# Altium PCB Membrane_Board_Latest.PcbDoc (part 2 of 4)
Units mil, origin at the board's own origin, x right, y up, seen from the top; angles counter-clockwise.
Board outline 11929.13 x 4962.8 mil, 2 copper layers (Top Layer, Bottom Layer), stack 59 mil thick; 247 components, 169 nets, 1256 pads, 657 vias.
Unrouted connection lines stored in the file: 293.
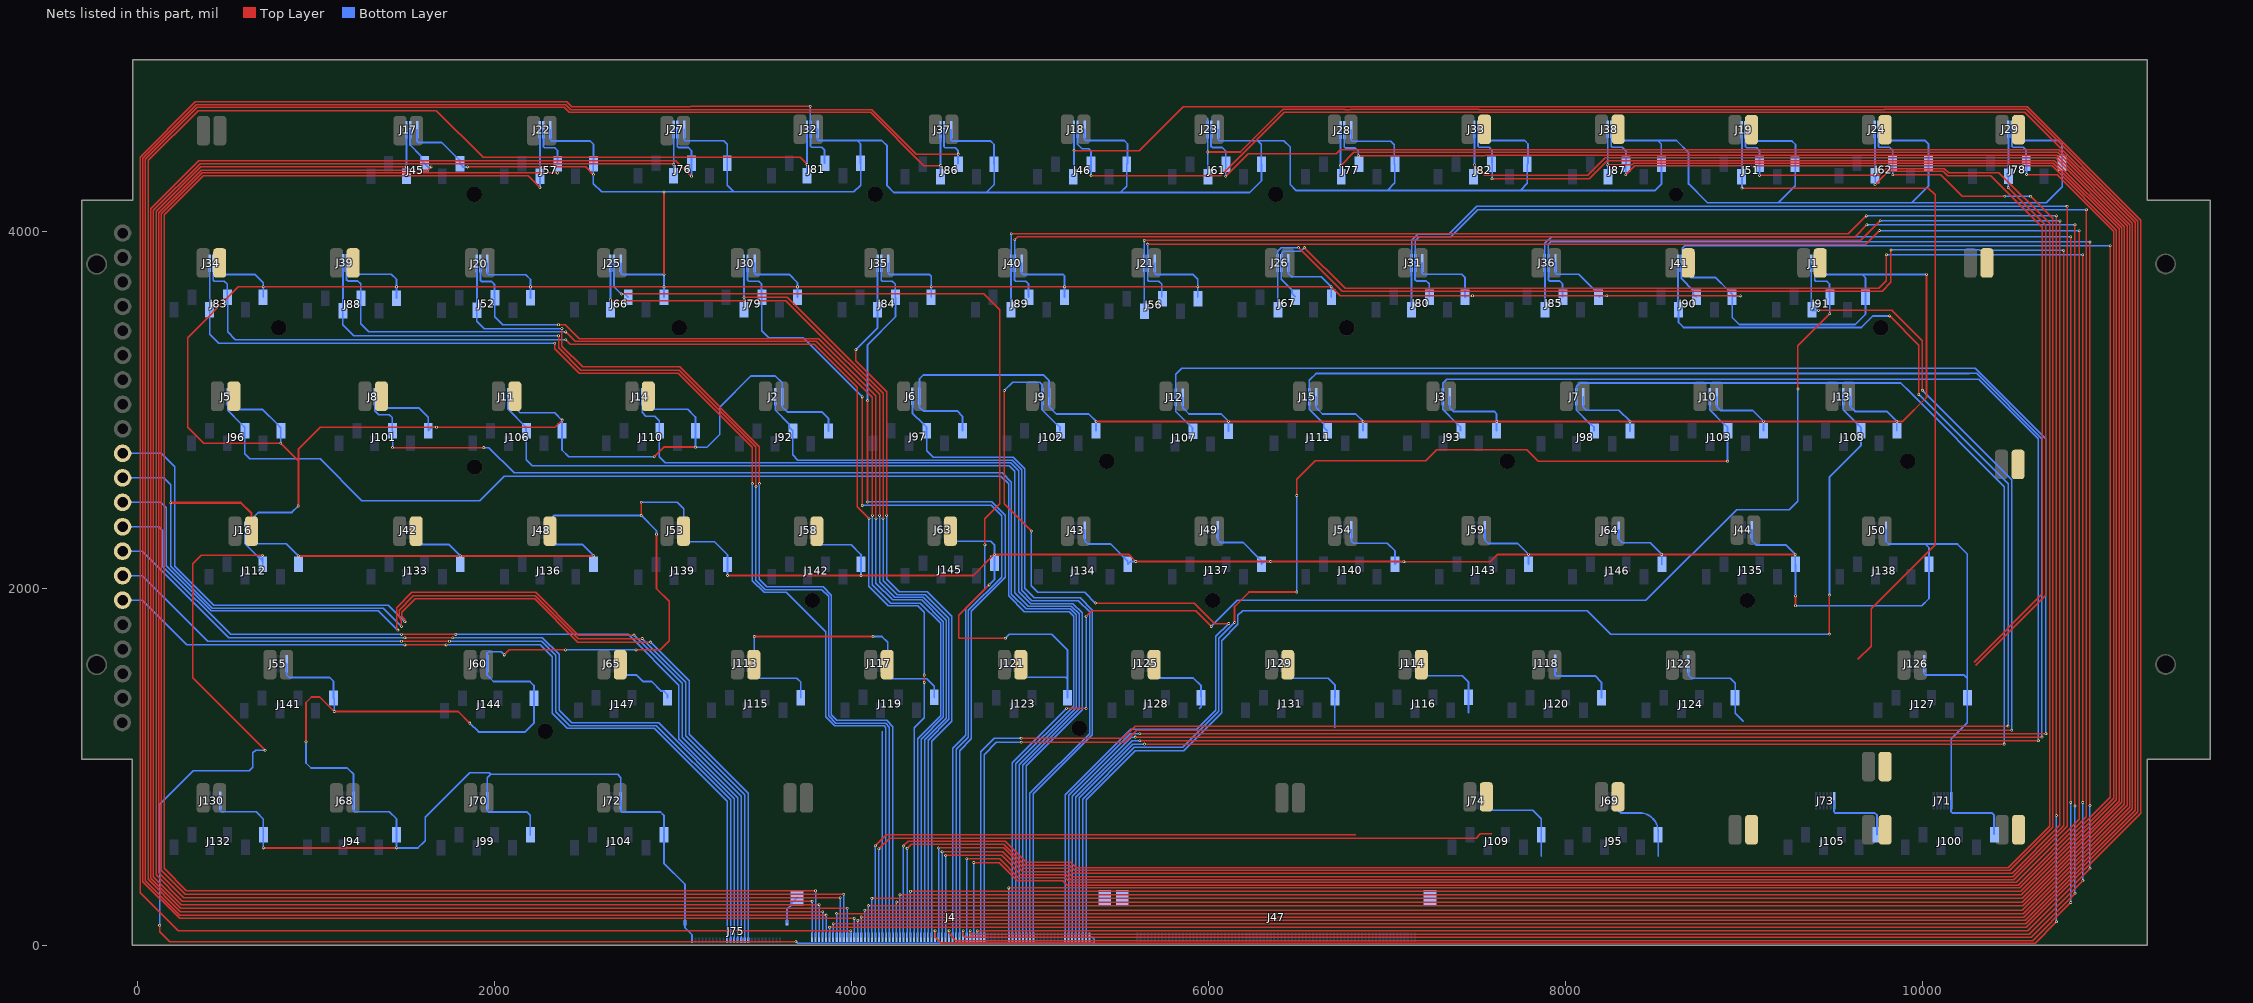
[diagram p2: the nets of this part, all layers, seen from the top]

## Via types
v1: diameter 15.75, hole 7.87, Top Layer to Bottom Layer, tented both sides, 655 vias
v2: diameter 23.62, hole 11.81, Top Layer to Bottom Layer, 2 vias

## Nets (pads, with @x,y where several pads share a name; then routed paths per layer and width w, separated by ;. In a path a pad name is that pad's centre, name@x,y a point inside that pad or via, vN(x,y) a via of type N, cw(c..) or ccw(c..) an arc to the next point about the centre after c; other vN are vias at no path point) (continued)
Col_2.COL_10: J75.10 P10.1 SW42.2 SW50.2 SW58.2 SW66.2 SW74.2 | length 5781.9
  Top Layer w8: v1(1497.31,1811.94) 1495.82,1813.43 1495.82,1827.73 1480.04,1843.51 1480.04,1866.71 1553.79,1940.46 2223.54,1940.46 2465.54,1698.46 v1(2873.74,1698.46)
  Bottom Layer w8: P10.1@-84.75,2756.11 131.14,2756.11 207,2680.25 207,2124.25 426.79,1904.46 1404.79,1904.46 v1(1497.31,1811.94) ; v1(2873.74,1698.46) 3090.84,1481.36 3090.84,1181.92 3420.84,851.92 J75.10@3420.84,28.46
Col_2.COL_11: J75.11 P11.1 SW43.2 SW51.2 SW59.2 SW67.2 SW75.2 | length 6270
  Top Layer w8: v1(1477.79,1786.46) 1477.79,1824.55 1465.04,1837.3 1465.04,1877.71 1544.79,1957.46 2228.33,1957.46 2467.33,1718.46 v1(2826.79,1718.46)
  Top Layer w12: v1(184.96,2479) 578,2479 637.52,2419.48 SW43.2@637.52,2320
  Bottom Layer w8: P11.1@-84.75,2618.96 145.31,2618.96 184.96,2579.31 184.96,2122.29 417.79,1889.46 1374.79,1889.46 v1(1477.79,1786.46) ; v1(2826.79,1718.46) 3071.16,1474.09 3071.16,1173.77 3401.16,843.77 J75.11@3401.16,28.46
Col_2.COL_12: J75.12 P12.1 SW44.2 SW52.2 SW60.2 SW68.2 SW76.2 | length 5580.5
  Top Layer w8: v1(1457.79,1765.46) 1457.79,1766.27 1450.04,1774.02 1450.04,1889.71 1536.79,1976.46 2230.54,1976.46 2469.54,1737.46 v1(2780.79,1737.46)
  Bottom Layer w8: P12.1@-84.75,2481.81 128.19,2481.81 158.79,2451.21 158.79,2126.46 410.79,1874.46 1348.79,1874.46 v1(1457.79,1765.46) ; v1(2780.79,1737.46) 3051.47,1466.77 3051.47,1165.61 3381.47,835.61 J75.12@3381.47,28.46
Col_2.COL_13: J75.13 P13.1 SW45.2 SW53.2 SW61.2 SW69.2 SW77.2 | length 5162.1
  Top Layer w8: v1(1477.79,1741.46) v1(1781.96,1741.46)
  Bottom Layer w8: P13.1@-84.75,2344.66 119.15,2344.66 141.59,2322.22 141.59,2120.66 520.79,1741.46 v1(1477.79,1741.46) ; v1@1787.96,1741.46 2748.23,1741.46 3031.79,1457.9 3031.79,1157.46 3361.79,827.46 J75.13@3361.79,28.46
Col_2.COL_14: J75.14 P14.1 SW46.2 SW54.2 SW62.2 SW70.2 SW78.2 | length 4993.4
  Top Layer w8: v1(1497.31,1722.4) v1(1764.79,1722.4)
  Bottom Layer w8: P14.1@-84.75,2207.51 25.25,2207.51 510.3,1722.46 542.79,1722.46 ; 526.54,1722.4 v1(1497.31,1722.4) ; v1(1764.79,1722.4) 2267.6,1722.4 2360.84,1629.16 2360.84,1316.92 2426.51,1251.25 2432.01,1245.76 2918.36,1245.76 3342.1,822.02 J75.14@3342.1,28.46
Col_2.COL_15: J75.15 P15.1 SW47.2 SW55.2 SW63.2 SW71.2 SW79.2 | length 4898.3
  Top Layer w8: v1(1477.79,1702.71) v1(1746.79,1702.71)
  Bottom Layer w8: P15.1@-84.75,2070.36 25.25,2070.36 393.15,1702.46 v1@1477.79,1702.46 ; v1(1746.79,1702.71) 2263.29,1702.71 2341.16,1624.84 2341.16,1308.77 2419.47,1230.46 2905.82,1230.46 3322.42,813.86 J75.15@3322.42,28.46
Col_2.COL_16: J75.16 P16.1 SW48.2 SW56.2 SW64.2 SW80.2 | length 4861.8
  Top Layer w8: v1(1497.31,1683.03) v1(1727.79,1683.03)
  Bottom Layer w8: P16.1@-84.75,1933.21 25.25,1933.21 275.43,1683.03 ; 319.79,1683.03 275.43,1683.03 ; v1(1497.31,1683.03) 275.43,1683.03 ; v1(1727.79,1683.03) 2255.97,1683.03 2321.47,1617.53 2321.47,1300.61 2406.63,1215.46 2892.98,1215.46 3302.73,805.71 J75.16@3302.73,28.46
GND: J1.6 J2.6 J3.6 J4.MP1 J4.MP2 J5.6 J6.6 J7.6 J8.6 J9.6 J10.6 J11.6 J12.6 J13.6 J14.6 J15.6 J16.6 J17.6 J18.6 J19.6 J20.6 J21.6 J22.6 J23.6 J24.6 J25.6 J26.6 J27.6 J28.6 J29.6 J30.6 J31.6 J32.6 J33.6 J34.6 J35.6 J36.6 J37.6 J38.6 J39.6 J40.6 J41.6 J42.6 J43.6 J44.6 J45.6 J46.6 J47.MP1 J47.MP2 J48.6 J49.6 J50.6 J51.6 J52.6 J53.6 J54.6 J55.6 J56.6 J57.6 J58.6 J59.6 J60.6 J61.6 J62.6 J63.6 J64.6 J65.6 J66.6 J67.6 J68.6 J69.6 J70.6 J71.6 J72.6 J73.6 J74.6 J75.26 J75.MP1 J75.MP2 J76.6 J77.6 J78.6 J79.6 J80.6 J81.6 J82.6 J83.6 J84.6 J85.6 J86.6 J87.6 J88.6 J89.6 J90.6 J91.6 J92.6 J93.6 J94.6 J95.6 J96.6 J97.6 J98.6 J99.6 J100.6 J101.6 J102.6 J103.6 J104.6 J105.6 J106.6 J107.6 J108.6 J109.6 J110.6 J111.6 J112.6 J113.6 J114.6 J115.6 J116.6 J117.6 J118.6 J119.6 J120.6 J121.6 J122.6 J123.6 J124.6 J125.6 J126.6 J127.6 J128.6 J129.6 J130.6 J131.6 J132.6 J133.6 J134.6 J135.6 J136.6 J137.6 J138.6 J139.6 J140.6 J141.6 J142.6 J143.6 J144.6 J145.6 J146.6 J147.6 | length 86289.4
  Top Layer w8: v1@1449.78,3689.56 v1(1449.96,3689.56) v1@2200.23,3689.56 ; v1(1847,4361.13) 2510.79,4361.13 v1(2553.79,4318.13) ; v1(2201,3689.56) v1(2949,3689.56) v1(3696.79,3689.56) v1(4445.79,3689.56) v1(5193.47,3689.56) v1(5939.79,3689.56) ; 4601.13,1720.46 4601.13,1849.7 v1(4770.34,2018.91) ; v1@5940.53,3689.56 v1(6687.3,3689.56) 6737.87,3639 v1(7479,3639) v1(8231,3639) 8231.5,3638.5 8979.5,3638.5 v1(8980,3638)
  Top Layer w10: v1@704.1,3689.56 v1@1449.78,3689.56 ; v1@704.27,545.27 v1(1450.69,545.27) ; v1@705.1,3689 564.33,3689 280,3404.67 280,2902 369.54,2812.46 v1(801.73,2812.46) 900.42,2713.77 ; v1(900.42,2181.46) v1(1807.79,2181.46) v1(2554.79,2181.46) ; v1@900.42,2461 900.42,2713.77 ; v1(943.07,1140.46) 943.07,1360.07 974,1391 1019.25,1391 v1(1100.79,1309.46) 1795.79,1309.46 v1(1860.79,1244.46) ; v1(2054,1627) 2082,1655 v1(2397,1655) ; v1(2378.79,2942.46) 2338.33,2902 v1(1674,2902) 1023.65,2902 900.42,2778.77 900.42,2713.77 ; v1(2792,1655) 2928,1655 2978,1705 2978,1927.25 2906.92,1998.33 v1(2906.92,2302.46) ; v1(2821,2407) v1(2821,2482) ; v1(2894,2737) 2948,2791 v1@3125,2791 ; v1(2949,3759) v1(2948.96,4220.46) ; v1(3304.79,2071.81) v1(4052.79,2071.81) 4682.1,2071.81 v1(4800.1,2189.81) 5552.19,2189.81 v1(5592,2150) v1(6347.79,2150) v1@7093.18,2150 ; v1(3454.16,1729.46) v1(4119.79,1729.46) ; 4601.13,1720.46 v1(4861.79,1720.46) ; v1(5369.79,2935) v1(6111.79,2935) v1(6866.1,2935) v1(7614.79,2935) v1(8361.79,2935) v1@9109.33,2935 ; v1(7094.73,2148.13) 7578.13,2148.13 7619.81,2189.81 v1(7792.79,2189.81) v1(8539.79,2189.81) v1(9287.79,2189.81) ; v1(9109.79,2935) v1(9856.79,2935) 9889,2935 10022.79,3068.79 v1(10022.79,3758.46) ; v1(9288.79,1902.46) v1(9288.79,1957.46)
  Bottom Layer w8: 1592.29,566.96 1610.79,585.46 1610.79,717.46 1859.08,965.75 1969.5,965.75 1977.79,957.46 ; J70.6@1958.84,809.75 1958.84,938.51 1977.79,957.46 ; J57.6@2553.73,4378.25 2553.73,4266.27 2599.54,4220.46 v1(2948.96,4220.46) 3340.79,4220.46 ; J72.6@2707.47,809.75 2707.47,939.47 2689.48,957.46 1977.79,957.46 ; J76.6@3303.16,4382.32 3303.16,4258.09 3340.79,4220.46 ; J81.6@4050.16,4380.25 4050.16,4301.24 4050.48,4300.92 4050.48,4259.14 4011.79,4220.46 3340.79,4220.46 ; 5947.79,1325.46 5958.1,1335.77 J128.6@5958.1,1387.25 J128.6@5958.1,1393.46 ; J85.6@8185.1,3631.25 8192.86,3639 v1(8231,3639)
  Bottom Layer w10: J34.6@462.16,3821.75 462.16,3764.61 468.02,3758.75 655.81,3758.75 703.1,3711.46 v1(703.1,3689.56) J83.6@703.1,3630.25 ; J130.6@462.84,810.75 462.84,753.61 468.7,747.75 663.5,747.75 703.79,707.46 J132.6@703.79,619.25 703.96,619.07 v1(703.96,545) ; J5.6@543.79,3073.75 544.61,3072.93 544.61,3017.25 560.86,3001 701,3001 781.45,2920.55 781.73,2920.55 801.73,2900.55 J96.6@801.73,2882.25 v1(801.73,2812.46) ; J55.6@835.16,1576.75 835.16,1513.88 849.04,1500 1076,1500 1097.1,1478.9 J141.6@1097.1,1385.25 1100.79,1381.56 v1(1100.79,1309.46) ; v1(900,2461) 864,2425 677,2425 640.47,2388.47 J16.6@640.47,2325.75 640.47,2265.53 657,2249 832.88,2249 v1(900.42,2181.46) ; v1(943.07,1140.46) 943.07,1020.93 971,993 1174,993 1209.79,957.21 J68.6@1209.79,810.75 1209.79,753.61 1215.65,747.75 1410.44,747.75 1450.73,707.46 J94.6@1450.73,619.25 v1(1450.69,545.27) 1570.6,545.27 1592.29,566.96 ; J39.6@1209.79,3822.75 1209.79,3765.61 1215.65,3759.75 1421.67,3759.75 1449.96,3731.46 v1(1449.96,3689.56) 1449.96,3626.44 J88.6@1450.79,3625.62 ; J8.6@1366.84,3073.75 1366.84,3016.61 1372.7,3010.75 1575.25,3010.75 1627.79,2958.21 J101.6@1627.79,2882.25 1647.54,2902 v1(1674,2902) ; J42.6@1564.16,2325.75 1564.68,2325.23 1564.68,2251.86 1570.54,2246 1742.56,2246 v1@1807.1,2181.46 ; J17.6@1565.21,4569.75 1565.21,4503.86 1571.07,4498 1704,4498 1785.45,4416.55 1786.16,4416.55 1806.16,4396.55 J45.6@1806.16,4378.25 1823.28,4361.13 v1(1847,4361.13) ; v1(1860.79,1244.46) 1909.79,1195.46 2170.79,1195.46 2219.79,1244.46 J144.6@2219.79,1384.62 2219.79,1455 2197.33,1477.46 1993.34,1477.46 1957.84,1512.95 J60.6@1957.84,1576.75 ; J60.6@1957.67,1576.92 1957.67,1636.96 1965.29,1644.58 2036.42,1644.58 v1(2054,1627) ; J70.6@1958.84,809.75 1958.84,752.61 1964.7,746.75 2180.42,746.75 2199.79,727.38 J99.6@2199.79,618.25 ; J20.6@1959.47,3819.75 1959.65,3819.58 1959.65,3762.61 1965.51,3756.75 2174.5,3756.75 2201,3730.25 v1(2201,3689.56) J52.6@2201,3626.33 ; J11.6@2114.47,3073.75 2114.47,3011.58 2142.06,2984 2335.88,2984 2377.42,2942.46 J106.6@2377.42,2882.25 2377.42,2774.58 2415,2737 v1(2894,2737) ; J22.6@2312.79,4569.75 2312.79,4512.61 2318.65,4506.75 2534.36,4506.75 2553.73,4487.38 2553.73,4423.02 ; v1(2397,1655) 2723,1655 ; J57.6@2553.73,4378.25 2553.79,4378.3 J57.6@2553.79,4421.13 ; v1@2554.42,2181.46 2489.88,2246 2335,2246 2313.47,2267.53 J48.6@2313.47,2325.75 2313.47,2388.14 2333.79,2408.46 2821,2408.46 2906.92,2322.54 v1(2906.92,2302.46) ; J72.6@2707.47,809.75 2707.47,752.61 2713.33,746.75 2917.79,746.75 2918.08,746.46 2929.34,746.46 2948.42,727.38 J104.6@2948.42,618.25 2948.42,459.58 3066.51,341.49 J75.MP1@3066.51,126.88 3066.51,98.49 3105.88,59.12 J75.26@3105.88,28.46 ; J25.6@2707.47,3821.75 2707.65,3821.58 2707.65,3764.61 2713.51,3758.75 2949,3758.75 v1(2949,3689.56) 2949,3630.83 J66.6@2948.42,3630.25 ; v1(2792,1655) 2723,1655 ; v1(2821,2482) 3023,2482 3059.84,2445.16 J53.6@3059.84,2324.75 3061.73,2322.86 3061.73,2275.95 3076.69,2261 3231.6,2261 3304.79,2187.81 J139.6@3304.79,2133.25 v1(3304.79,2071.81) ; J14.6@2865.16,3073.75 2866.12,3072.79 2866.12,3017.39 2880.51,3003 3082,3003 3125.1,2959.9 J110.6@3125.1,2882.25 3125.1,2790.63 3190,2790.63 3260.79,2861.42 3260.79,3015.46 3434.79,3189.46 3572.54,3189.46 3611.16,3150.84 J2.6@3611.16,3072.75 ; J147.6@2968.73,1386.25 2968.73,1404 2948.73,1424 2933,1424 2879,1478 2830,1478 2793.25,1514.75 2711.82,1514.75 2705.96,1520.61 2705.96,1577.58 2705.79,1577.75 2705.79,1637.79 2723,1655 ; J27.6@3062.21,4570.75 3062.21,4513.61 3068.07,4507.75 3283.79,4507.75 3303.16,4488.38 J76.6@3303.16,4382.32 ; v1(3454.16,1729.46) J113.6@3454.16,1578.75 3454.16,1518.16 3475.94,1496.38 3693.62,1496.38 3715.1,1474.9 J115.6@3715.1,1387.25 ; J30.6@3456.16,3821.75 3456.33,3821.58 3456.33,3764.61 3462.19,3758.75 3650.35,3758.75 3697.1,3712 J79.6@3697.1,3630.25 ; J2.6@3611.56,3072.35 3611.56,3015.84 3639.4,2988 3832,2988 3871.1,2948.9 J92.6@3871.1,2881.25 ; J75.MP2@3637.38,126.88 3637.38,201.38 3663.71,227.71 3663.71,236.47 J4.MP1@3694.14,266.9 ; J58.6@3807.84,2325.75 3807.84,2260.16 3824.62,2243.38 3998.22,2243.38 4052.79,2188.81 J142.6@4052.79,2134.25 v1(4052.79,2071.81) ; J32.6@3809.21,4571.75 3809.39,4571.58 3809.39,4514.61 3815.25,4508.75 4030.79,4508.75 ; J81.6@4050.16,4380.25 4050.16,4489.38 4030.79,4508.75 ; v1(4119.79,1729.46) 4170.54,1729.46 4202.16,1697.84 J117.6@4202.16,1579.75 ; J117.6@4202,1575 4202.16,1574.84 4202.16,1514.92 4223.62,1493.46 4420.1,1493.46 4463.1,1450.46 J119.6@4463.1,1388.25 ; J35.6@4205.16,3821.75 4205.33,3821.58 4205.33,3764.61 4211.19,3758.75 4435.5,3758.75 4446.1,3748.14 J84.6@4446.1,3630.25 ; J37.6@4557.21,4568.75 4557.21,4511.61 4563.07,4505.75 4778.79,4505.75 4798.16,4486.38 J86.6@4798.16,4377.25 ; J63.6@4559.16,2326.75 4559.16,2269.61 4565.02,2263.75 4780.73,2263.75 4800.1,2244.38 v1(4800.1,2189.81) 4800.1,2048.68 v1(4770.34,2018.91) ; J97.6@4621.1,2883.25 4621.1,2963.9 4591,2994 4401,2994 4380.16,3014.84 J6.6@4380.16,3074.75 4380.16,3172.83 4402.79,3195.46 5073.54,3195.46 5106.84,3162.16 J9.6@5106.84,3073.75 5107.05,3073.55 5107.05,3016.64 5147.23,2976.46 5328.33,2976.46 v1(5369.79,2935) J102.6@5369.79,2882.25 ; J86.6@4798.79,4376.62 4798.79,4262.46 4753.79,4217.46 ; v1(4861.79,1720.46) 4883.79,1742.46 5120.79,1742.46 5210.42,1652.83 J123.6@5210.42,1387.25 ; J121.6@4950.47,1578.75 J121.6@4950.47,1578.75 4950.52,1522.52 4972.04,1501 5200,1501 5209,1492 ; J40.6@4952.53,3821.75 4952.7,3821.58 4952.7,3764.61 4958.56,3758.75 5184.5,3758.75 5193.47,3749.77 v1(5193.47,3689.56) J89.6@5193.47,3630.25 ; J18.6@5305.16,4571.75 5305.16,4514.61 5311.02,4508.75 5526.73,4508.75 5546.1,4489.38 J46.6@5546.1,4380.25 ; J43.6@5306.47,2325.75 5306.47,2265.53 5324,2248 5451.97,2248 5547.42,2152.55 J134.6@5547.42,2134.25 5563.17,2150 v1(5592,2150) ; J46.6@5541.79,4376.62 5541.79,4253.46 5505.79,4217.46 ; J125.6@5697.16,1578.75 5697.16,1516.84 5716.88,1497.12 5914.88,1497.12 5958.1,1453.9 J128.6@5958.1,1393.46 ; J21.6@5698.47,3821.75 5698.65,3821.58 5698.65,3764.61 5704.51,3758.75 5912.13,3758.75 5939.42,3731.46 J56.6@5939.42,3630.25 ; J12.6@5856.02,3068.92 5856.02,3010.98 5890.54,2976.46 6070.33,2976.46 v1(6111.79,2935) J107.6@6111.79,2879.25 ; J49.6@6052.84,2326.75 6052.84,2268.84 6064.69,2257 6193,2257 6276.45,2173.55 6276.79,2173.55 6296.79,2153.55 J137.6@6296.79,2135.25 6311.54,2150 v1(6347.79,2150) ; J23.6@6053.84,4570.75 6053.84,4513.61 6059.7,4507.75 6275.42,4507.75 ; J129.6@6445,1587.92 6445.58,1587.92 6446.68,1586.83 6446.68,1580.56 6447.38,1579.86 6447.38,1521.34 6472.33,1496.38 6670.62,1496.38 6708,1459 6708,1387.83 J131.6@6707.42,1387.25 6707.42,1219.46 ; J26.6@6447.16,3822.75 6447.16,3763.84 6466,3745 6632.67,3745 6688.1,3689.56 J67.6@6688.1,3631.25 ; J15.6@6603.16,3073.75 6603.16,3011.92 6638.62,2976.46 6824.65,2976.46 v1(6866.1,2935) J111.6@6866.1,2882.25 ; J28.6@6799.21,4567.75 6799.21,4510.61 6805.07,4504.75 7020.79,4504.75 7040.16,4485.38 J77.6@7040.16,4376.25 ; J54.6@6800.79,2326.75 6800.79,2264.21 6813,2252 7002,2252 7044.73,2209.27 J140.6@7044.73,2135.25 7059.49,2150 7061.36,2148.13 v1(7094.73,2148.13) ; J77.6@7043.79,4376.62 7043.79,4271.46 7000.79,4228.46 ; J114.6@7194.16,1579.75 7194.16,1520.88 7205.04,1510 7421,1510 7457,1474 ; J31.6@7196.84,3822.75 7196.84,3765.61 7202.7,3759.75 7418.42,3759.75 7437.79,3740.38 J80.6@7437.79,3631.25 7445.54,3639 v1(7479,3639) ; J3.6@7351.21,3073.75 7351.21,3010.87 7371.08,2991 7600.25,2991 7614.79,2976.46 ; 7457.1,1302.77 J116.6@7457.1,1388.25 7457.1,1474 ; J59.6@7548.79,2326.75 7548.95,2326.59 7548.95,2269.59 7567.54,2251 7731.55,2251 7792.73,2189.81 J143.6@7792.73,2135.25 ; J33.6@7549.21,4571.75 7549.21,4514.61 7555.07,4508.75 7770.79,4508.75 7790.16,4489.38 J82.6@7790.16,4380.25 ; 7569.79,756.46 7815.79,756.46 7864.47,707.77 J109.6@7864.47,619.25 7863.79,618.56 7863.79,498.46 ; J93.6@7614.16,2882.25 7614.16,2976.46 ; J82.6@7785.79,4376.62 7785.79,4268.46 7745.79,4228.46 ; J118.6@7941.7,1576.45 7941.7,1514.86 7947.56,1509 8166,1509 8201.47,1473.53 J120.6@8201.47,1387.25 ; J36.6@7944.16,3822.75 7944.16,3765.61 7950.02,3759.75 8074.25,3759.75 8164.45,3669.55 J85.6@8200.45,3669.55 ; J7.6@8099.21,3072.75 8099.21,3014.68 8115.89,2998 8299.16,2998 8362.16,2935 J98.6@8362.16,2881.25 ; J38.6@8295.47,4571.75 8295.47,4514.61 8301.33,4508.75 8517.05,4508.75 ; J64.6@8297.47,2325.75 8299.36,2323.86 8299.36,2274.58 8318.95,2255 8474.6,2255 v1(8539.79,2189.81) 8539.79,2134.88 J146.6@8540.42,2134.25 ; J69.6@8299.47,809.75 8299.47,751.36 8309.38,741.46 8414.54,741.46 cw(c8414.54,636.21) 8519.79,636.21 8519.79,619.62 J95.6@8519.42,619.25 8519.42,498.83 ; J87.6@8536.42,4380.25 8536.42,4489.38 8517.05,4508.75 ; J87.6@8538.79,4376.62 8538.79,4267.46 8499.79,4228.46 7745.79,4228.46 ; J122.6@8688.84,1577.75 8688.84,1514.24 8707.08,1496 8923,1496 8950.79,1468.21 J124.6@8950.79,1386.25 8950.79,1300.46 8995.79,1255.46 ; J41.6@8690.16,3821.75 8690.16,3755.84 8704,3742 8840,3742 8913.45,3668.55 8914.1,3668.55 8934.1,3648.55 J90.6@8934.1,3630.25 ; J10.6@8847.53,3073.75 8848.02,3073.26 8848.02,3017.02 8869.04,2996 9048.47,2996 9109.47,2935 J103.6@9109.47,2882.25 ; v1@8979.24,3638 8941.86,3638 J90.6@8934.1,3630.25 ; J44.6@9044.79,2326.75 9044.96,2326.58 9044.96,2266.04 9068,2243 9234.6,2243 v1(9287.79,2189.81) 9287.79,2136.19 J135.6@9288.73,2135.25 v1@9288.73,1957.46 ; J19.6@9047.84,4568.75 9047.84,4511.61 9053.7,4505.75 9269.42,4505.75 9288.79,4486.38 J51.6@9288.79,4377.25 ; J51.6@9286.79,4376.62 9287.79,4375.62 9287.79,4255.79 9192,4160 ; v1(9288.79,1902.46) 9996.79,1902.46 10036.79,1942.46 J138.6@10036.79,2134.25 10036.79,2227.21 10016,2248 ; J1.6@9440.16,3821.75 9440.16,3764.61 9446.02,3758.75 9661.73,3758.75 ; J73.6@9504.84,809.75 9504.84,747.32 9510.7,741.46 9731.71,741.46 9745.79,727.38 J105.6@9745.79,619.25 ; J13.6@9595.84,3073.75 9595.33,3073.24 9595.83,3072.74 9595.33,3072.24 9596.33,3071.24 9596.33,3017.33 9622.67,2991 9800.79,2991 v1(9856.79,2935) J108.6@9856.79,2882.25 ; J24.6@9792.53,4572.75 9792.53,4515.61 9798.39,4509.75 10014.1,4509.75 10033.47,4490.38 J62.6@10033.47,4381.25 10033.47,4253.47 9940,4160 ; J50.6@9795.84,2325.75 9795.84,2262.16 9810,2248 10016,2248 ; J126.6@10010.79,1577.75 10010.79,1520.61 10016.65,1514.75 10232.36,1514.75 10251.73,1495.38 ; v1@10022.79,3758.75 9661.73,3758.75 ; J71.6@10160.84,810.12 10160.84,747.32 10166.7,741.46 10388.08,741.46 10401.79,727.75 J100.6@10401.79,621.69 ; J71.6@10161.21,809.75 10161.21,1155.88 10251.73,1246.4 J127.6@10251.73,1386.25 10251.73,1495.38 ; J29.6@10540.84,4571.75 10540.84,4514.61 10546.7,4508.75 10762.42,4508.75 10781.79,4489.38 J78.6@10781.79,4380.25 10783.79,4378.25 10783.79,4249.79 10694,4160 9940,4160 ; 4030.79,4508.75 4168.5,4508.75 4198.79,4478.46 4198.79,4255.46 4236.79,4217.46 4753.79,4217.46 ; 4753.79,4217.46 5505.79,4217.46 ; 5505.79,4217.46 6230.79,4217.46 6296.79,4283.46 J61.6@6296.79,4376.62 6296.79,4377.25 6294.79,4379.25 6294.79,4488.38 6275.42,4507.75 ; 6275.42,4507.75 6422.5,4507.75 6457.79,4472.46 6457.79,4262.46 6491.79,4228.46 7000.79,4228.46 ; 7000.79,4228.46 7745.79,4228.46 ; 8517.05,4508.75 8622.25,4508.75 8690,4441 8690,4266 8796,4160 9192,4160 ; J90.6@8934.1,3630.25 8934.1,3517 8973.1,3478 9624,3478 9681.1,3535.1 J91.6@9681.1,3630.25 9681.1,3739.38 9661.73,3758.75 ; 9192,4160 9940,4160 ; 10016,2248 10196,2248 10251.73,2192.27 10251.73,1495.38
  other v1: 3125,2790.63
I2C1.SCL_1: J4.9 J17.4 J45.4 | length 9696.6
  Top Layer w8: v1(1644,4361.13) 1625.13,4342.25 354.83,4342.25 118,4105.43 118,406 258,266 v1(3936,266)
  Bottom Layer w8: J4.9@3936,44.73 v1(3936,266)
  Bottom Layer w10: J17.4@1525.84,4569.75 1525.84,4484.16 1586.16,4423.84 1586.16,4401.13 1626.16,4361.13 v1(1644,4361.13)
I2C1.SCL_2: J4.10 J22.4 J57.4 | length 10369.2
  Top Layer w8: v1(2352.1,4327.25) 361.04,4327.25 133,4099.21 133,419 266,286 v1(3956,286)
  Bottom Layer w8: J4.10@3955.95,44.46 v1(3956,286)
  Bottom Layer w10: J22.4@2273.42,4569.75 2273.42,4474.61 2279.28,4468.75 2336.1,4468.75 2352.1,4452.75 J57.4@2352.1,4379.88
I2C1.SCL_3: J4.11 J27.4 J76.4 | length 11390.4
  Top Layer w8: v1@3101.53,4308.54 3015.07,4395 342,4395 73,4126 73,374.85 240.85,207 v1(3976,207)
  Bottom Layer w8: J4.11@3976,44.82 v1(3976,207)
  Bottom Layer w10: J27.4@3022.84,4570.75 3022.84,4475.61 3028.7,4469.75 3085.53,4469.75 3103.16,4452.12 J76.4@3103.16,4382.32 v1(3103.16,4308.54)
I2C1.SCL_4: J4.12 J32.4 J81.4 | length 12510.7
  Top Layer w8: v1(3768.79,4700.87) 3101,4700.87 3097.12,4697 2431.43,4697 2403.43,4725 322.36,4725 13,4415.64 13,294 226,81 v1(3995,81)
  Bottom Layer w8: v1(3768.79,4700.87) 3768.79,4638.46 3769.32,4637.93 3769.32,4572.28 J32.4@3769.84,4571.75 ; J4.12@3995,44.78 3995.16,44.95 3995.16,80.84 v1(3995,81)
  Bottom Layer w10: J32.4@3769.84,4571.75 3769.84,4476.61 3775.7,4470.75 3832.53,4470.75 3848.53,4454.75 J81.4@3848.53,4381.88
I2C1.SCL_5: J4.13 J37.4 J86.4 | length 13296.2
  Top Layer w8: v1@4015.76,150 234.21,150 28,356.21 28,4409.43 328.57,4710 2397.21,4710 2425.21,4682 4113,4682 4362.17,4432.83 v1(4597.16,4432.83)
  Bottom Layer w8: J4.13@4015.01,44.46 v1(4015,150)
  Bottom Layer w10: J37.4@4517.84,4568.75 4517.84,4473.61 4523.7,4467.75 4580.53,4467.75 4596.53,4451.75 J86.4@4596.53,4378.88
I2C1.SCL_6: J4.14 J18.4 J46.4 | length 17365.7
  Top Layer w8: v1(4035,139) 10575,139 11192,756 11192,4050.71 10574.71,4668 9793.78,4668 9793.03,4667.25 7509.55,4667.25 7508.8,4668 6800.04,4668 6799.29,4667.25 6758.8,4667.25 6758.06,4668 6425,4668 6069.46,4312.46 v1@5344.47,4312.46
  Bottom Layer w8: J4.14@4035,44.76 v1(4035,139)
  Bottom Layer w10: J18.4@5265.79,4571.75 5265.79,4488.21 5291,4463 5328,4463 5341.79,4449.21 J46.4@5341.79,4376.62 v1(5341.79,4312.46)
I2C1.SCL_7: J4.15 J23.4 J61.4 | length 16414.1
  Top Layer w8: v1(4054,158) 10569,158 11177,766 11177,4044.49 10764.74,4456.75 6738.75,4456.75 6716.46,4434.46 6222.79,4434.46 v1(6096.79,4308.46)
  Bottom Layer w8: J4.15@4054,44.84 v1@4054,162
  Bottom Layer w10: J23.4@6014.47,4570.75 6014.47,4475.61 6020.33,4469.75 6077.16,4469.75 6096.79,4450.12 J61.4@6096.79,4376.62 v1(6096.79,4308.46) ; v1@6094.79,4308.46 v1@6094.79,4310.01
I2C1.SCL_8: J4.16 J28.4 J77.4 | length 15398.5
  Top Layer w8: v1(4074,196) 10560,196 11147,783 11147,4032.07 10752.32,4426.75 7552.94,4426.75 7549.06,4422.88 v1(6839.84,4422.88)
  Bottom Layer w8: v1(4074,196) 4074.06,195.94 J4.16@4074.06,44.46
  Bottom Layer w10: J28.4@6759.84,4567.75 6759.84,4472.61 6765.7,4466.75 6822.53,4466.75 6838.53,4450.75 6838.53,4432.46 ; v1(6839.84,4422.88) 6839.84,4431.15
I2C1.SCL_9: J4.25 J33.4 J82.4 | length 14572.4
  Top Layer w8: v1(4251,242) 10559,242 11117,800 11117,4019.64 10739.89,4396.75 8234.75,4396.75 8132.46,4294.46 v1(7588.53,4294.46)
  Bottom Layer w8: J4.25@4251.23,44.46 4251.23,234 ; J82.4@7585.79,4376.62 7588.53,4373.88 v1(7588.53,4294.46)
  Bottom Layer w10: J33.4@7509.84,4571.75 7509.84,4476.61 7515.7,4470.75 7572.53,4470.75 7588.53,4454.75 J82.4@7588.53,4381.88
I2C1.SCL_10: J4.26 J38.4 J87.4 | length 13708
  Top Layer w8: v1(4271,283) 10555,283 11087,815 11087,4007.21 10727.46,4366.75 8387.41,4366.75 v1(8337.79,4317.13)
  Bottom Layer w8: J4.26@4270.92,44.46 v1@4270.92,283
  Bottom Layer w10: J38.4@8256.1,4571.75 8256.1,4476.61 8261.96,4470.75 8318.79,4470.75 8338.79,4450.75 J87.4@8338.79,4376.62 ; v1(8337.79,4317.13) J87.4@8337.79,4376.62
I2C1.SCL_11: J4.27 J19.4 J51.4 | length 12571.2
  Top Layer w8: v1(4290.68,556) 4317.68,583 4860,583 4978,465 5227.58,465 5258.58,434 10481,434 10713,666 10713,4044 10428,4329 10146.21,4329 10123.46,4351.75 9797.75,4351.75 9759.46,4313.46 v1(9087.16,4313.46)
  Bottom Layer w8: J4.27@4290.6,44.46 4290.6,74.05 4290.68,74.13 v1(4290.68,556)
  Bottom Layer w10: J19.4@9008.47,4568.75 9008.47,4473.61 9014.33,4467.75 9071.16,4467.75 9087.16,4451.75 v1(9087.16,4313.46)
I2C1.SCL_12: J4.28 J24.4 J62.4 | length 11820.5
  Top Layer w8: v1(4311,543) 4334,566 4852.96,566 4970.96,448 5220.54,448 5249.54,419 10488,419 10731,662 10731,4072 v1(10606,4197)
  Top Layer w10: v1(9833.84,4317.58) 10103.42,4317.58 10224,4197 v1(10461,4197)
  Bottom Layer w8: J4.28@4310.29,44.46 4311,45.17 v1(4311,543)
  Bottom Layer w10: J24.4@9753.16,4572.75 9753.16,4477.61 9759.02,4471.75 9815.55,4471.75 9833.84,4453.46 v1(9833.84,4317.58) ; v1(10461,4197) v1(10606,4197)
I2C1.SCL_13: J4.29 J29.4 J78.4 | length 11333.8
  Top Layer w8: v1(4330,302) 10551,302 11072,823 11072,4001 10754.54,4318.46 v1(10583,4318.46)
  Bottom Layer w8: J4.29@4329.97,44.46 v1(4330,302)
  Bottom Layer w10: J29.4@10501.47,4571.75 10501.47,4476.61 10507.33,4470.75 10564.16,4470.75 10580.79,4454.12 J78.4@10580.79,4380.25 ; J78.4@10581.79,4380.25 10583,4379.04 v1(10583,4318.46)
I2C1.SCL_14: J4.30 J34.4 J83.4 | length 7468.8
  Top Layer w8: v1(2398.79,3392.46) 2422.79,3368.46 3790.79,3368.46 4033,3126.25 4033,2456 4097.44,2391.56 v1(4097.44,2391.46) ; v1(4407,1472.81) v1(4407,1513.93)
  Bottom Layer w8: J83.4@503.1,3630.25 503.1,3437.14 547.79,3392.46 v1(2398.79,3392.46) ; v1@4097.44,2391.56 v1(4097.44,2391.46) 4097.44,2010.72 4206.7,1901.46 4370.79,1901.46 4407,1865.25 v1(4407,1513.93) ; J4.30@4349.66,44.46 4349.66,74.05 4349.73,74.13 4349.73,1217.73 4407,1275 v1(4407,1472.81) v1@4407,1476.81
  Bottom Layer w10: J34.4@422.79,3821.75 422.79,3726.61 428.65,3720.75 485.47,3720.75 501.47,3704.75 J83.4@501.47,3631.88 ; J83.4@503.1,3630.25 J83.4@503.1,3630.85
I2C1.SCL_15: J4.31 J39.4 J88.4 | length 6820.9
  Top Layer w8: v1(2398.79,3436.46) 2451.79,3383.46 3803.06,3383.46 4117.05,3069.47 v1(4117.05,2408.2)
  Bottom Layer w8: J88.4@1249.79,3632.88 1249.79,3480.83 1294.16,3436.46 v1(2398.79,3436.46) ; v1(4117.05,2408.2) 4117.05,2018.84 4218.43,1917.46 4384.79,1917.46 4499,1803.25 4499,1287 4369.34,1157.34 J4.31@4369.34,44.46
  Bottom Layer w10: J39.4@1170.42,3822.75 1170.42,3727.61 1176.28,3721.75 1233.1,3721.75 1249.1,3705.75 J88.4@1249.1,3632.88 ; J88.4@1249.79,3632.88 1249.79,3673.93
I2C1.SCL_16: J4.32 J20.4 J52.4 | length 6021.3
  Top Layer w8: v1(2357.82,3476.14) 2395.86,3476.14 2473.54,3398.46 3815.79,3398.46 3827.29,3386.96 4136.66,3077.59 v1(4136.66,2391.46)
  Bottom Layer w8: J52.4@1999.79,3628.62 1999.79,3520.83 2044.97,3475.65 2221.37,3475.65 2221.87,3476.14 v1(2357.82,3476.14) ; v1(4136.66,2391.46) 4136.66,2027.18 4229.38,1934.46 4392.79,1934.46 4514,1813.25 4514,1280 4389.1,1155.1 4389.1,74.13 4389.03,74.05 J4.32@4389.03,44.46
  Bottom Layer w10: J20.4@1920.1,3819.75 1920.1,3724.61 1925.96,3718.75 1982.79,3718.75 1998.79,3702.75 J52.4@1998.79,3629.88
I2C1.SCL_17: J4.41 J25.4 J66.4 | length 6016.7
  Top Layer w8: v1(2710,3649) 4740.25,3649 4829,3560.25 4829,2473 4746.79,2390.79 v1(4746.79,2243.46)
  Bottom Layer w8: J4.41@4566.19,44.46 4566.19,1103.86 4640,1177.67 4640,1888.67 4746.79,1995.46 v1(4746.79,2243.46)
  Bottom Layer w10: J25.4@2668.1,3821.75 2668.1,3690.9 v1(2710,3649) 2729.67,3649 J66.4@2748.42,3630.25
I2C1.SCL_18: J4.42 J30.4 J79.4 | length 5039.7
  Top Layer w8: v1(4059.79,2464.46) v1(4059.79,3072.46)
  Bottom Layer w8: J79.4@3497.1,3630.25 3497.1,3442.14 3535.79,3403.46 3729.45,3403.46 v1@4059.79,3073.12 ; v1(4059.79,2464.46) 4758,2464.46 4782.33,2464.46 4840.79,2406 4840.79,2062.67 4655,1876.88 4655,1166.67 4585.88,1097.55 J4.42@4585.88,44.46
  Bottom Layer w10: J30.4@3416.79,3821.75 3416.79,3726.61 3422.65,3720.75 3479.47,3720.75 3495.47,3704.75 J79.4@3495.47,3631.88
I2C1.SCL_19: J4.43 J35.4 J84.4 | length 4743.1
  Top Layer w10: v1(4089.79,2483.46) v1(4089.79,3051.46)
  Bottom Layer w8: v1@4084.79,2483.46 v1(4089.79,2483.46) 4784.54,2483.46 4859.79,2408.21 4859.79,2060.46 4670,1870.67 4670,1155.67 4604.88,1090.55 4604.88,74.73 4605.56,74.05 J4.43@4605.56,44.46
  Bottom Layer w10: v1(4089.79,3051.46) 4089.79,3364.79 4246.1,3521.1 J84.4@4246.1,3630.25 ; J35.4@4165.79,3821.75 4165.79,3726.61 4171.65,3720.75 4228.47,3720.75 4244.47,3704.75 J84.4@4244.47,3631.88
I2C1.SCL_20: J4.44 J40.4 J89.4 | length 16507.1
  Top Layer w8: v1(4625.26,81.28) 4625.26,54.74 4634.79,45.21 10609.51,45.21 v1(10855.11,290.81) ; v1(4913.79,3952.46) 4931.79,3970.46 9622.79,3970.46 v1(9688.79,4036.46) ; v1(10854.79,780) v1(10854.79,4036.46)
  Bottom Layer w8: J4.44@4625.25,44.46 v1(4625.26,81.28) ; J40.4@4913.16,3821.75 4913.16,3951.83 v1(4913.79,3952.46) ; v1(9688.79,4036.46) v1(10854.79,4036.46) ; v1(10854.79,780) 10854.89,779.89 v1@10854.89,290.81
  Bottom Layer w10: J40.4@4913.16,3821.75 4913.16,3726.61 4919.02,3720.75 4975.84,3720.75 4991.84,3704.75 J89.4@4991.84,3631.88
I2C1.SCL_21: J4.45 J21.4 J56.4 | length 15784.4
  Top Layer w8: v1(4645,484) 4829,484 4934,379 5196,379 5222,353 10525,353 10878.79,706.79 v1(10878.79,4003.46) ; v1(5658.79,3928.46) 9682.79,3928.46 v1(9758.79,4004.46) v1@9759.79,4004.46
  Bottom Layer w8: J4.45@4645,44.53 v1(4645,484) ; J21.4@5659.1,3821.75 v1@5659.1,3927.77 ; v1@9759.79,4004.46 10877.79,4004.46 v1(10878.79,4003.46)
  Bottom Layer w10: J21.4@5659.1,3821.75 5659.1,3726.61 5664.96,3720.75 5721.79,3720.75 5737.79,3704.75 J56.4@5737.79,3631.88
I2C1.SCL_22: J4.46 J26.4 J67.4 | length 14960.6
  Top Layer w8: v1(4664.63,81.28) 4664.63,64.69 4667.86,61.46 10598.61,61.46 v1(10898.98,361.83) ; v1(6536.95,3908.77) 6765.72,3680 9756,3680 9798.14,3722.14 v1(9798.14,3869.11) ; v1(10898.54,799.46) v1(10898.54,3868.71)
  Bottom Layer w8: J4.46@4664.62,44.46 v1(4664.63,81.28) ; J26.4@6407.79,3822.75 6409.1,3824.06 6409.1,3878.51 6420.04,3889.46 6517.64,3889.46 v1(6536.95,3908.77) ; v1(9798.14,3869.11) 9798.29,3868.96 10427.29,3868.96 10427.54,3868.71 v1(10898.54,3868.71) ; v1(10898.54,799.46) 10898.77,799.23 v1@10898.77,361.83
  Bottom Layer w10: J26.4@6407.79,3822.75 6407.79,3731.21 6468.1,3670.9 6468.1,3651.25 J67.4@6486.47,3632.88
I2C1.SCL_23: J4.47 J31.4 J80.4 | length 14478.4
  Top Layer w8: v1(4684,463.28) 4827.72,463.28 4929,362 5184,362 5209,337 10536,337 10918.79,719.79 v1(10918.79,4120.46)
  Bottom Layer w8: J4.47@4684.3,44.46 v1@4684.3,463.28 ; J31.4@7157.47,3822.75 7157.47,3947.14 7179.79,3969.46 7356.79,3969.46 7507.79,4120.46 v1(10918.79,4120.46)
  Bottom Layer w10: J31.4@7157.47,3822.75 7157.47,3727.61 7163.33,3721.75 7220.16,3721.75 7236.16,3705.75 J80.4@7236.16,3632.88
I2C1.SCL_24: J4.48 J36.4 J85.4 | length 13326.6
  Top Layer w8: v1(4704,81.28) 10591.28,81.28 v1(10939,429) ; v1(10938.79,782.79) v1(10938.79,3940.46)
  Bottom Layer w8: J4.48@4703.99,44.46 v1(4704,81.28) ; J36.4@7904.79,3822.75 7904.79,3926.46 7918.79,3940.46 v1(10938.79,3940.46) ; v1@10938.79,429 v1(10938.79,782.79)
  Bottom Layer w10: J36.4@7904.79,3822.75 7904.79,3727.61 7910.65,3721.75 7967.47,3721.75 7983.47,3705.75 J85.4@7983.47,3632.88
I2C1.SCL_25: J4.57 J41.4 J90.4 | length 12462.3
  Top Layer w8: v1(4881,321) 10546,321 11053,828 11053,1199.67 v1(11053,3919.46)
  Bottom Layer w8: J4.57@4881,44.61 v1(4881,321) ; J41.4@8653.79,3821.75 8653.79,3905.46 8667.79,3919.46 v1(11053,3919.46)
  Bottom Layer w10: J41.4@8650.79,3821.75 8650.79,3734.21 8714.1,3670.9 8714.1,3650.25 J90.4@8732.47,3631.88
I2C1.SDA_1: J4.1 J17.3 J45.3 | length 9426.5
  Top Layer w8: v1(1505.79,4361.13) 352.49,4361.13 103,4111.64 103,394 250.21,246.79 v1(3778.79,246.79)
  Bottom Layer w8: J4.1@3778.79,44.46 v1@3778.79,247.79
  Bottom Layer w10: 1505.79,4413.87 v1(1505.79,4361.13) 1505.79,4307.75 J45.3@1506.16,4307.38 ; 1505.97,4413.87 1505.97,4569.56 J17.3@1506.16,4569.75
I2C1.SDA_2: J4.2 J22.3 J57.3 | length 10172.2
  Top Layer w8: v1(2253.73,4246.25) 2187.73,4312.25 367.25,4312.25 148,4093 148,430 273,305 v1(3798,305)
  Bottom Layer w8: J4.2@3798,44.93 v1(3798,305)
  Bottom Layer w10: v1(2253.73,4246.25) J57.3@2253.73,4307.38 J22.3@2253.73,4569.75
I2C1.SDA_3: J4.3 J27.3 J76.3 | length 10999.2
  Top Layer w8: v1(3003.78,4375.16) 3001.68,4375.16 2996.84,4380 350.15,4380 88,4117.85 88,383 244,227 v1(3818,227) v1@3818.68,227
  Bottom Layer w8: J4.3@3818.16,44.46 v1@3818.16,227
  Bottom Layer w10: J76.3@3003.16,4311.46 3003.78,4312.08 v1(3003.78,4375.16) ; v1@3003.16,4374.54 J27.3@3003.16,4570.75
I2C1.SDA_4: J4.4 J32.3 J81.3 | length 12223.1
  Top Layer w8: v1(3750.73,4374.54) 3711.27,4414 1935,4414 1672,4677 338,4677 58,4397 58,368.64 238.64,188 v1(3838,188)
  Bottom Layer w8: J4.4@3837.84,44.46 v1@3837.84,188
  Bottom Layer w10: J81.3@3750.16,4309.38 3750.16,4311.46 J32.3@3750.16,4571.75
I2C1.SDA_5: J4.5 J37.3 J86.3 | length 13033.8
  Top Layer w8: v1(3857.37,169) 236.43,169 43,362.43 43,4403.21 334.79,4695 2391,4695 2419,4667 4106.79,4667 4404.96,4368.83 v1(4498.79,4368.83)
  Bottom Layer w8: J4.5@3857.37,44.61 v1(3857.37,169)
  Bottom Layer w10: J86.3@4498.16,4306.38 J37.3@4498.16,4568.75
I2C1.SDA_6: J4.6 J18.3 J46.3 | length 17594.8
  Top Layer w8: v1(3877,101) 10583,101 11222,740 11222,4063.13 10587.13,4698 9781.36,4698 9780.61,4697.25 7521.97,4697.25 7521.22,4698 6787.61,4698 6786.87,4697.25 6771.23,4697.25 6769.48,4699 6398.37,4699 6396.62,4697.25 6026.6,4697.25 6025.85,4698 5857,4698 5611.46,4452.46 v1(5246.1,4452.46)
  Bottom Layer w8: J4.6@3877,44.67 v1(3877,101)
  Bottom Layer w10: J46.3@5246.1,4309.38 v1(5246.1,4452.46) J18.3@5246.1,4571.75
I2C1.SDA_7: J4.7 J23.3 J61.3 | length 16852.7
  Top Layer w8: v1(3897,120) 10580,120 11207,747 11207,4056.92 10580.92,4683 9787.57,4683 9786.82,4682.25 7515.76,4682.25 7515.01,4683 6793.83,4683 6793.08,4682.25 6765.02,4682.25 6764.27,4683 6417,4683
  Top Layer w10: v1@5994.43,4444.46 v1(5995.29,4444.46) 6178.46,4444.46 6417,4683
  Bottom Layer w8: J4.7@3897,44.56 v1(3897,120) ; 5994.43,4634.46 5994.61,4634.28 5994.61,4570.93 J23.3@5994.79,4570.75
  Bottom Layer w10: J23.3@5994.79,4570.75 5995.29,4570.25 v1(5995.29,4444.46) 5995.29,4367.96 5995.79,4367.46 J61.3@5995.79,4309.38
I2C1.SDA_8: J4.8 J28.3 J77.3 | length 15771.6
  Top Layer w8: v1(3916,177) 10566,177 11162,773 11162,4038.28 10758.53,4441.75 6813.45,4441.75 v1(6740.16,4368.46)
  Bottom Layer w8: v1@3916,176 3916,45.04 J4.8@3916.58,44.46
  Bottom Layer w10: J77.3@6740.16,4305.38 v1(6740.16,4368.46) J28.3@6740.16,4567.75
I2C1.SDA_9: J4.17 J33.3 J82.3 | length 14814.9
  Top Layer w8: v1(4094,222) 10563,222 11132,791 11132,4025.85 10746.1,4411.75 8223.75,4411.75 8126,4314 7548.62,4314 v1(7490.16,4372.46)
  Bottom Layer w8: J4.17@4093.75,44.46 4093.75,74.05 4093.79,74.09 4093.79,221.79 v1(4094,222)
  Bottom Layer w10: J82.3@7490.16,4309.38 v1(7490.16,4372.46) J33.3@7490.16,4571.75
I2C1.SDA_10: J4.18 J38.3 J87.3 | length 13922.6
  Top Layer w8: v1(4114,263) 10558,263 11102,807 11102,4013.43 10733.68,4381.75 8381.2,4381.75 8371.54,4372.09 v1(8236.78,4372.09)
  Bottom Layer w8: J4.18@4113.44,44.46 4113.22,44.68 4113.22,237.78 4113,238 4113.44,238.44 v1@4113.44,263
  Bottom Layer w10: J87.3@8236.42,4309.38 8236.78,4309.75 v1(8236.78,4372.09) ; v1@8236.42,4372.46 J38.3@8236.42,4571.75
I2C1.SDA_11: J4.19 J19.3 J51.3 | length 7435.4
  Top Layer w8: v1@4133.12,557.02 4194.1,618 6824,618 ; v1(8988.79,4242.46) 10032.54,4242.46 10071,4204 10071,2243 9712,1884 9712,1676.46 9637,1601.46
  Bottom Layer w8: J4.19@4133.12,44.46 v1(4133.12,557)
  Bottom Layer w10: v1(8988.79,4242.46) J19.3@8988.79,4568.75
I2C1.SDA_12: J4.20 J24.3 J62.3 | length 7966.6
  Top Layer w8: v1(4152.81,540) 4212.81,600 7499,600 7522.75,623.75 7585.79,623.75 ; v1(9734.79,4262.27) 9782.93,4310.41 9782.93,4311.07 9808.6,4336.75 10117.25,4336.75 10143,4311 10383,4311 10672,4022 10672,1968 10290.46,1586.46
  Bottom Layer w8: J4.20@4152.81,44.46 v1(4152.81,540) ; v1(9734.79,4262.27) 9734.79,4358.58
  Bottom Layer w10: J24.3@9733.47,4572.75 9734.13,4572.09 9734.13,4406.12 9734.79,4405.46 9734.79,4358.58
I2C1.SDA_13: J4.21 J29.3 J78.3 | length 4408.5
  Top Layer w8: 10298.46,1568.46 10692,1962 10692,4034 v1(10481,4245)
  Bottom Layer w8: 4172.23,1198.79 4172.23,445.72 4172.49,445.46 J4.21@4172.49,44.46
  Bottom Layer w10: v1(10481,4245) 10481,4308.59 J78.3@10481.79,4309.38 J29.3@10481.79,4571.75
I2C1.SDA_14: J4.22 J34.3 J83.3 | length 7010.7
  Top Layer w8: v1(2336.47,3372.46) 2336.47,3342.1 2473.11,3205.46 3028.54,3205.46 3444.42,2789.58 v1(3444.42,2586.46)
  Bottom Layer w8: J83.3@403.1,3559.38 403.1,3422.14 452.79,3372.46 v1(2336.47,3372.46) ; v1(3444.42,2586.46) 3444.42,2042.05 3509.47,1977 3635.25,1977 3855.79,1756.46 3855.79,1278.78 3906.11,1228.46 3921.54,1228.46 4181.79,1228.46 4192.18,1218.07 J4.22@4192.18,44.46
  Bottom Layer w10: J83.3@403.1,3559.38 J34.3@403.1,3821.75
I2C1.SDA_15: J4.23 J39.3 J88.3 | length 6389.8
  Top Layer w8: v1(2357.82,3415.46) 2357.82,3348.59 2483.64,3222.77 3033.01,3222.77 3464.1,2791.68 v1(3464.1,2570.46)
  Bottom Layer w8: J88.3@1149.79,3560.38 1149.79,3476.21 1210.54,3415.46 v1(2357.82,3415.46) ; v1(3464.1,2570.46) 3464.1,2044.14 3515.79,1992.46 3833.58,1992.46 3870.79,1955.25 3870.79,1285 3912.33,1243.46 4190.79,1243.46 4211.86,1222.39 J4.23@4211.86,44.46
  Bottom Layer w10: J88.3@1150.73,3560.38 J39.3@1150.73,3822.75
I2C1.SDA_16: J4.24 J20.3 J52.3 | length 5662.6
  Top Layer w8: v1(2376.79,3455.46) 2376.79,3357.46 2494.25,3240 3037,3240 3483.79,2793.21 v1(3483.79,2586.46)
  Bottom Layer w8: J52.3@1899.79,3557.75 1899.79,3496.46 1940.79,3455.46 v1(2376.79,3455.46) ; v1(3483.79,2586.46) 3483.79,2049.46 3525.79,2007.46 3839.79,2007.46 3885.79,1961.46 3885.79,1291.21 3917.54,1259.46 4196.79,1259.46 4231.55,1224.7 J4.24@4231.55,44.46
  Bottom Layer w10: J20.3@1900.42,3819.75 1901.79,3818.38 J52.3@1901.79,3557.75
I2C1.SDA_17: J4.33 J25.3 J66.3 | length 5330.1
  Top Layer w8: v1(2648.79,3617.46) 2650.89,3617.46 2657.09,3611.25 3630.94,3611.25 3796.76,3445.43 4156.42,3085.78 v1(4156.42,2408.2)
  Bottom Layer w8: v1(4156.42,2408.2) 4156.42,2035.15 4241.92,1949.65 4401.6,1949.65 4530,1821.25 4530,1273 4408.71,1151.71 J4.33@4408.71,44.46
  Bottom Layer w10: J66.3@2648.42,3559.38 J25.3@2648.42,3821.75
I2C1.SDA_18: J4.34 J30.3 J79.3 | length 4605.9
  Top Layer w8: v1(3397,3630.13) 3639.8,3630.13 4176.03,3093.9 v1(4176.03,2391.46)
  Bottom Layer w8: v1(4176.03,2391.46) 4176.03,2043.49 4254.87,1964.65 4411.6,1964.65 4545,1831.25 4545,1266 4428.47,1149.47 4428.47,74.13 4428.4,74.05 J4.34@4428.4,44.46
  Bottom Layer w10: v1@3397,3635.13 v1(3397,3630.13) 3397,3559.48 J79.3@3397.1,3559.38 ; v1@3397.1,3635.13 J30.3@3397.1,3821.75
I2C1.SDA_19: J4.35 J35.3 J84.3 | length 4186.3
  Top Layer w8: v1(4024,3337) 4024,3273.66 4195.64,3102.02 v1(4195.64,2408.2)
  Bottom Layer w8: v1(4195.64,2408.2) 4195.64,2051.61 4267.6,1979.65 4422.6,1979.65 4560,1842.25 4560,1256 4448.08,1144.08 4448.08,453 J4.35@4448.08,44.46
  Bottom Layer w10: v1(4024,3337) 4145.79,3458.79 4145.79,3559.06 J84.3@4146.1,3559.38 ; J84.3@4144.79,3560.69 4144.79,3625.46 4145.45,3626.12 4145.45,3821.09 J35.3@4146.1,3821.75
I2C1.SDA_20: J4.36 J40.3 J89.3 | length 16700.8
  Top Layer w8: v1(4467.6,81.1) 4467.6,44.62 4501.22,11 10631,11 v1(10751,131) ; v1(4894.79,3986.46) 9584.79,3986.46 v1(9684.79,4086.46) ; v1(10750.79,726.79) v1(10750.79,4086.46)
  Bottom Layer w8: v1(4467.6,81.1) 4467.68,81.02 4467.68,44.54 J4.36@4467.77,44.46 ; J40.3@4893.47,3821.75 4894.79,3823.06 v1(4894.79,3986.46) ; v1(9684.79,4086.46) v1(10750.79,4086.46) ; v1(10750.79,726.79) 10750.89,726.68 v1@10750.89,131
  Bottom Layer w10: J89.3@4893.47,3559.38 J40.3@4893.47,3821.75
I2C1.SDA_21: J4.37 J21.3 J56.3 | length 15906.8
  Top Layer w8: v1(4487.45,544.73) 4852.27,544.73 4965,432 5213,432 5241,404 10504,404 10770.79,670.79 v1(10770.79,4058.46) ; v1(5639.79,3949.46) 9653.79,3949.46 v1(9763.79,4059.46)
  Bottom Layer w8: J4.37@4487.45,44.46 v1(4487.45,544.73) ; J21.3@5639.79,3822.12 v1(5639.79,3949.46) ; v1(9763.79,4059.46) 10769.79,4059.46 v1(10770.79,4058.46)
  Bottom Layer w10: J56.3@5639.42,3559.38 J21.3@5639.42,3821.75
I2C1.SDA_22: J4.38 J26.3 J67.3 | length 15207.3
  Top Layer w8: v1(4507.14,523.86) 4847.14,523.86 4959,412 5207,412 5235,384 10507,384 10791.13,668.13 v1(10791.13,3893.46) ; v1(6504.1,3908.77) 6747.88,3665 9774,3665 9823.79,3714.79 v1(9823.79,3895.46)
  Bottom Layer w8: J4.38@4507.14,44.46 v1(4507.14,523.86) ; J26.3@6388.1,3822.75 6388.1,3889.1 6407.77,3908.77 v1(6504.1,3908.77) ; v1(9823.79,3895.46) 10317.69,3895.46 10319.69,3893.46 v1(10791.13,3893.46)
  Bottom Layer w10: J67.3@6388.1,3560.38 J26.3@6388.1,3822.75
I2C1.SDA_23: J4.39 J31.3 J80.3 | length 14540.3
  Top Layer w8: v1@4526.15,504 4840,504 4949,395 5202,395 5229,368 10513,368 10810.79,665.79 v1(10810.79,4140.46)
  Bottom Layer w8: J4.39@4527,44.64 v1(4527,503) v1@4527,504 ; J31.3@7137.79,3822.75 7137.79,3950.79 7171.46,3984.46 7347.1,3984.46 7503.1,4140.46 v1(10810.79,4140.46)
  Bottom Layer w10: J80.3@7137.79,3560.38 J31.3@7137.79,3822.75
I2C1.SDA_24: J4.40 J36.3 J85.3 | length 13505.7
  Top Layer w8: v1(4546.52,81.28) 4546.52,64.13 4584.65,26 10617,26 v1@10830.78,239.78 ; v1(10830.79,800.21) v1(10830.79,3969.46)
  Bottom Layer w8: J4.40@4546.51,44.46 v1(4546.52,81.28) ; J36.3@7885.1,3822.75 7885.1,3932.77 7921.79,3969.46 v1(10830.79,3969.46) ; v1@10830.79,239.56 v1(10830.79,800.21)
  Bottom Layer w10: J85.3@7885.1,3560.38 J36.3@7885.1,3822.75
  other v1: 10831,239.56
I2C1.SDA_25: J4.49 J41.3 J90.3 | length 10984.1
  Top Layer w8: v1(4950,1160) 5520.15,1159.92 5588.15,1227.92 v1(10480,1227.92)
  Top Layer w10: v1(9816,3526) 9979.84,3362.16 v1(9979.84,3086.16)
  Bottom Layer w8: J4.49@4723.67,44.46 4723.67,1084.67 4799,1160 v1(4950,1160) ; v1(9979.84,3086.16) 10480,2586 v1(10480,1227.92) ; v1@10481.48,1228.43 v1@10482,1227.92
  Bottom Layer w10: J41.3@8631.1,3821.75 8631.1,3562.38 J90.3@8634.1,3559.38 ; J90.3@8633.79,3559.06 8633.79,3489.21 8662,3461 9658,3461 9723,3526 v1(9816,3526)
I2C5.SCL_26: J1.4 J4.58 J91.4 | length 7831.2
  Top Layer w8: v1@5204,1326.77 5313.48,1326.77 v1(5313.79,1326.46) ; v1(5313.79,1842.46) 5345.33,1874 5927.25,1874 v1(6014.79,1786.46) ; v1(9302.79,3116.46) 9302.79,3360.13 v1(9480.79,3538.13)
  Bottom Layer w8: J4.58@4900.84,44.46 4900.84,1023.61 v1@5204.76,1327.54 ; 5313.79,1334.46 v1(5313.79,1842.46) ; v1(6014.79,1786.46) 6160.79,1932.46 8450.98,1932.46 8958.98,2440.46 9254.46,2440.46 9302.79,2488.79 v1(9302.79,3116.46)
  Bottom Layer w10: J1.4@9396.79,3821.75 9396.79,3726.61 9402.65,3720.75 9463.47,3720.75 9479.47,3704.75 J91.4@9479.47,3631.88 ; v1(9480.79,3538.13) 9481.1,3538.44 J91.4@9481.1,3630.25
  other v1: 5204,1327.08
I2C5.SCL_27: J4.59 J5.4 J96.4 | length 7795.7
  Bottom Layer w8: 600.1,2755.14 628.79,2726.46 1021.54,2726.46 1256.54,2491.46 1917.46,2491.46 2055,2629 4837,2629 4879.79,2586.21 4879.79,1957.46 4967.79,1869.46 5218.58,1869.46 5243.49,1844.54 5243.49,1339.16 4920.52,1016.19 J4.59@4920.52,44.46
  Bottom Layer w10: J5.4@504.42,3073.75 504.42,2996.58 580.45,2920.55 581.73,2920.55 600.1,2902.18 600.1,2755.14
I2C5.SCL_28: J4.60 J8.4 J101.4 | length 6885.9
  Top Layer w8: v1@1426,2788 v1(1427.79,2788) v1(1939,2788)
  Bottom Layer w8: J8.4@1327.47,3073.75 1327.47,2994.53 1349.25,2972.75 1373,2972.75 ; v1@1427.79,2789.72 1427.48,2790.03 1427.48,2791.58 1427.79,2791.89 J101.4@1427.79,2882.25 ; v1(1939,2788) 1967,2788 2109,2646 4845.25,2646 4895.79,2595.46 4895.79,1967.46 4978.79,1884.46 5224.79,1884.46 5258.49,1850.75 5258.49,1330.16 5170.79,1242.46 4940.21,1011.88 J4.60@4940.21,44.46
  Bottom Layer w10: 1373,2972.75 1410.16,2972.75 1426.16,2956.75 J101.4@1426.16,2883.88
I2C5.SCL_29: J4.61 J11.4 J106.4 | length 6188.9
  Bottom Layer w8: J106.4@2177.42,2882.25 2177.42,2720.83 2211.25,2687 4883.25,2687 4914.79,2655.46 4914.79,1975.46 4990.79,1899.46 5231.79,1899.46 5274.49,1856.75 5274.49,1324.16 4959.89,1009.56 J4.61@4959.89,44.46
  Bottom Layer w10: J11.4@2075.1,3073.75 2075.1,3002.87 2175.79,2902.18 J106.4@2175.79,2883.88
I2C5.SCL_30: J4.62 J14.4 J110.4 | length 5481.7
  Bottom Layer w8: J14.4@2825.79,3073.75 2825.79,2987.21 2848,2965 2898,2965 2923.47,2939.53 2923.47,2735.77 2957.25,2702 4891.25,2702 4935.79,2657.46 4935.79,1981.46 5002.79,1914.46 5239.79,1914.46 5292.49,1861.75 5292.49,1319.16 4979.58,1006.25 J4.62@4979.58,44.46
I2C5.SCL_31: J2.4 J4.63 J92.4 | length 4750.5
  Bottom Layer w8: J92.4@3669.47,2882.88 3669.47,2747.77 3698.79,2718.46 4898.79,2718.46 4953.79,2663.46 4953.79,1988.46 5010.79,1931.46 5269.79,1931.46 5334,1867.25 5334,1185.67 4999.26,850.93 J4.63@4999.26,44.46
  Bottom Layer w10: J2.4@3572,3071.84 3572,2999 3651.1,2919.9 3651.1,2901.25 J92.4@3669.47,2882.88
I2C5.SCL_32: J4.64 J6.4 J97.4 | length 3995
  Bottom Layer w8: J97.4@4421.1,2883.25 4421.1,2771.14 4458.79,2733.46 4906.79,2733.46 4969.79,2670.46 4969.79,2001.46 5024.79,1946.46 5280.61,1946.46 5349,1878.06 5349,1178.67 5018.95,848.62 J4.64@5018.95,44.46
  Bottom Layer w10: J6.4@4340.79,3074.75 4340.79,2981.21 4400.45,2921.55 4401.1,2921.55 4419.47,2903.18 J97.4@4419.47,2884.88
I2C5.SCL_33: J4.73 J9.4 J102.4 | length 5241
  Top Layer w8: v1(4856,3108) 4856,2472.92 v1(5007.79,2321.13) ; v1(5365.79,1917.46) 5918.79,1917.46 6033.79,1802.46 v1(6112.79,1802.46)
  Bottom Layer w8: v1(5007.79,2321.13) 5007.79,2013.46 5043.79,1977.46 5305.79,1977.46 v1(5365.79,1917.46) ; J4.73@5196.11,44.46 5196.11,842.78 5563.79,1210.46 5934.79,1210.46 6040.79,1316.46 6040.79,1730.46 v1(6112.79,1802.46)
  Bottom Layer w10: v1(4856,3108) 4902,3154 5055,3154 5067.47,3141.53 J9.4@5067.47,3073.75 ; J9.4@5067,3072.75 5067,3000 5146.45,2920.55 5149.79,2920.55 5168.16,2902.18 J102.4@5168.16,2883.88
I2C5.SCL_34: J4.74 J12.4 J107.4 | length 13481.6
  Top Layer w8: v1(5615,1185) v1(10692,1185)
  Bottom Layer w8: J4.74@5215.8,44.46 5215.8,840.8 5560,1185 v1(5615,1185) ; J12.4@5816.47,3070.75 5816.47,3199.92 5850.01,3233.46 10295.97,3233.46 10692,2837.43 v1@10692,1183.53
  Bottom Layer w10: J12.4@5816.47,3070.75 5816.47,2990.61 5889.53,2917.55 5891.79,2917.55 5910.16,2899.18 J107.4@5910.16,2880.88
I2C5.SCL_35: J4.75 J15.4 J111.4 | length 12631.9
  Top Layer w8: v1(5589,1166) v1(10670,1166)
  Bottom Layer w8: J4.75@5235.48,44.46 5235.48,833.48 5568,1166 v1(5589,1166) ; 10261,3203.46 10304.75,3203.46 10670,2838.21 v1(10670,1166)
  Bottom Layer w10: J111.4@6666.1,2882.25 6646.1,2902.25 6646.1,2920.9 6563.79,3003.21 J15.4@6563.79,3073.75 6563.79,3164.79 6602.46,3203.46 10261,3203.46
I2C5.SCL_36: J3.4 J4.76 J93.4 | length 11792.7
  Top Layer w8: v1(5615,1146) v1(10650,1146) v1@10650.06,1146
  Bottom Layer w8: J4.76@5255.17,44.46 5255.17,828.17 5573,1146 v1(5615,1146) ; J3.4@7314.73,3073.75 7314.73,3095.23 7311.84,3098.12 7311.84,3148.84 7335.46,3172.46 10314.54,3172.46 10650,2837 v1(10650,1146)
  Bottom Layer w10: J3.4@7312,3070.11 7312,3002 7393.45,2920.55 7394.16,2920.55 7412.53,2902.18 J93.4@7412.53,2883.88
I2C5.SCL_37: J4.77 J7.4 J98.4 | length 10469.8
  Top Layer w8: v1(5641,1127) v1(10458.79,1127)
  Bottom Layer w8: J4.77@5274.85,44.46 5274.85,825.85 5576,1127 v1(5641,1127) ; 9934.5,3094.5 10458.79,2570.21 v1(10458.79,1127)
  Bottom Layer w10: J98.4@8160.53,2882.88 8160.53,2901.18 8142.16,2919.55 8139.45,2919.55 8059.84,2999.16 J7.4@8059.84,3072.75 8060.95,3073.86 8060.95,3128.95 8082,3150 9879,3150 9934.5,3094.5
I2C5.SCL_38: J4.78 J10.4 J103.4 | length 6293.2
  Top Layer w10: v1(6145.79,1808.46) 6145.79,1897.79 6227,1979 v1(6494,1979) ; v1(6494,2520) 6494,2612 6597,2715 7217,2715 7278,2776 7783,2776 7847,2712 v1(8908.16,2712)
  Bottom Layer w8: J4.78@5294.54,44.46 5294.54,818.54 5584,1108 5854.33,1108 6057.79,1311.46 6057.79,1720.46 v1@6145.74,1808.41
  Bottom Layer w10: v1@6494,1978 v1(6494,1979) v1(6494,2520) ; J10.4@8808.16,3073.75 8808.16,2999.61 8887.21,2920.55 8889.47,2920.55 8908.16,2901.87 v1(8908.16,2712)
I2C5.SCL_39: J4.79 J13.4 J108.4 | length 7139.1
  Top Layer w8: v1(9478.79,1961.46) 9478.79,1744.46 v1@9479.79,1743.46
  Bottom Layer w8: J4.79@5314.22,44.46 5314.22,816.22 5589,1091 5860.33,1091 6072.79,1303.46 6072.79,1706.46 6165,1798.67 6165,1849 6190.46,1874.46 8121.79,1874.46 8252.79,1743.46 v1(9478.79,1743.46)
  Bottom Layer w10: v1(9478.79,1961.46) 9478.79,2622.79 9655.16,2799.16 9655.16,2902.18 9556.47,3000.87 J13.4@9556.47,3073.75
I2C5.SCL_40: J4.80 J16.4 J112.4 | length 8683.8
  Top Layer w8: v1(122.79,112) 122.79,76.21 179,20 v1(3688,20) ; v1(698.79,2184.46) 355.25,2184.46 307.79,2137 307.79,1498.46 v1(713.79,1092.46)
  Bottom Layer w8: v1(122.79,112) 122.79,788.46 311.33,977 624.33,977 645.79,998.46 645.79,1077.46 660.79,1092.46 v1(713.79,1092.46) ; v1(3688,20) 3698,10 5355,10 5360.52,15.52 5360.52,32.48 5348,45 J4.80@5334.45,45
  Bottom Layer w10: J16.4@601.1,2325.75 601.1,2248.9 677.45,2172.55 680.42,2172.55 J112.4@699.61,2153.37 ; v1(698.79,2184.46) 698.79,2172.55 J112.4@699.61,2153.37 ; J112.4@699.77,2149.55 J112.4@699.61,2153.37 ; J112.4@700.42,2134.25 700.42,2152.55 J112.4@699.61,2153.37
I2C5.SDA_26: J1.3 J4.50 J91.3 | length 10181.4
  Top Layer w8: v1@4950.25,1136.75 5529.75,1136.75 5597.75,1204.75 v1(10501,1204.75) ; v1(9418,3557) 9829,3557 9999.72,3386.28 v1(9999.72,3110)
  Bottom Layer w8: J4.50@4743.36,44.46 4743.36,1068.36 4811.83,1136.83 v1(4950.17,1136.83) ; v1(9999.72,3110) 10500.79,2608.93 v1@10500.79,1204.75
  Bottom Layer w10: J1.3@9377.1,3821.75 9377.1,3563.38 J91.3@9381.1,3559.38 9383.48,3557 v1(9418,3557)